# Altium PCB MotorBoardPCB.PcbDoc
Units mil, origin at the board's own origin, x right, y up, seen from the top; angles counter-clockwise.
Board outline 6000 x 4000 mil, 2 copper layers (Top Layer, Bottom Layer); 8 components, 5 nets, 17 pads, 2 vias.
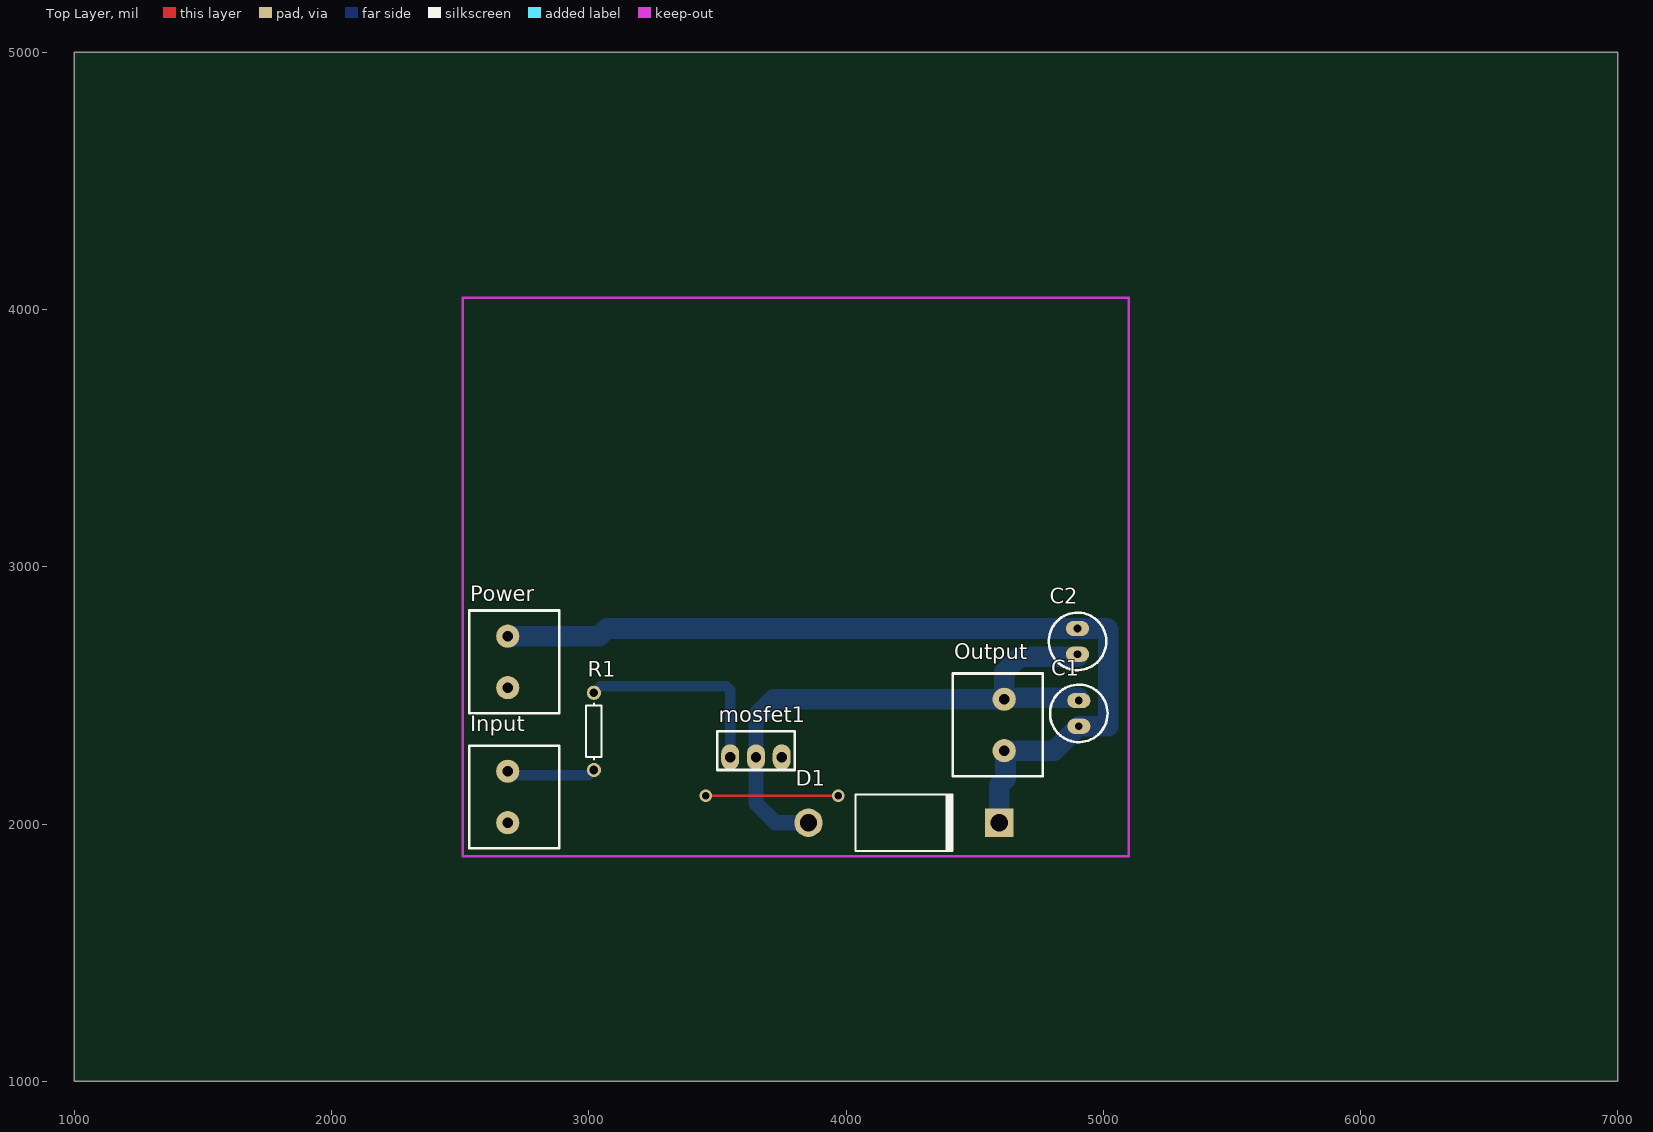
[diagram p0: Top Layer view]
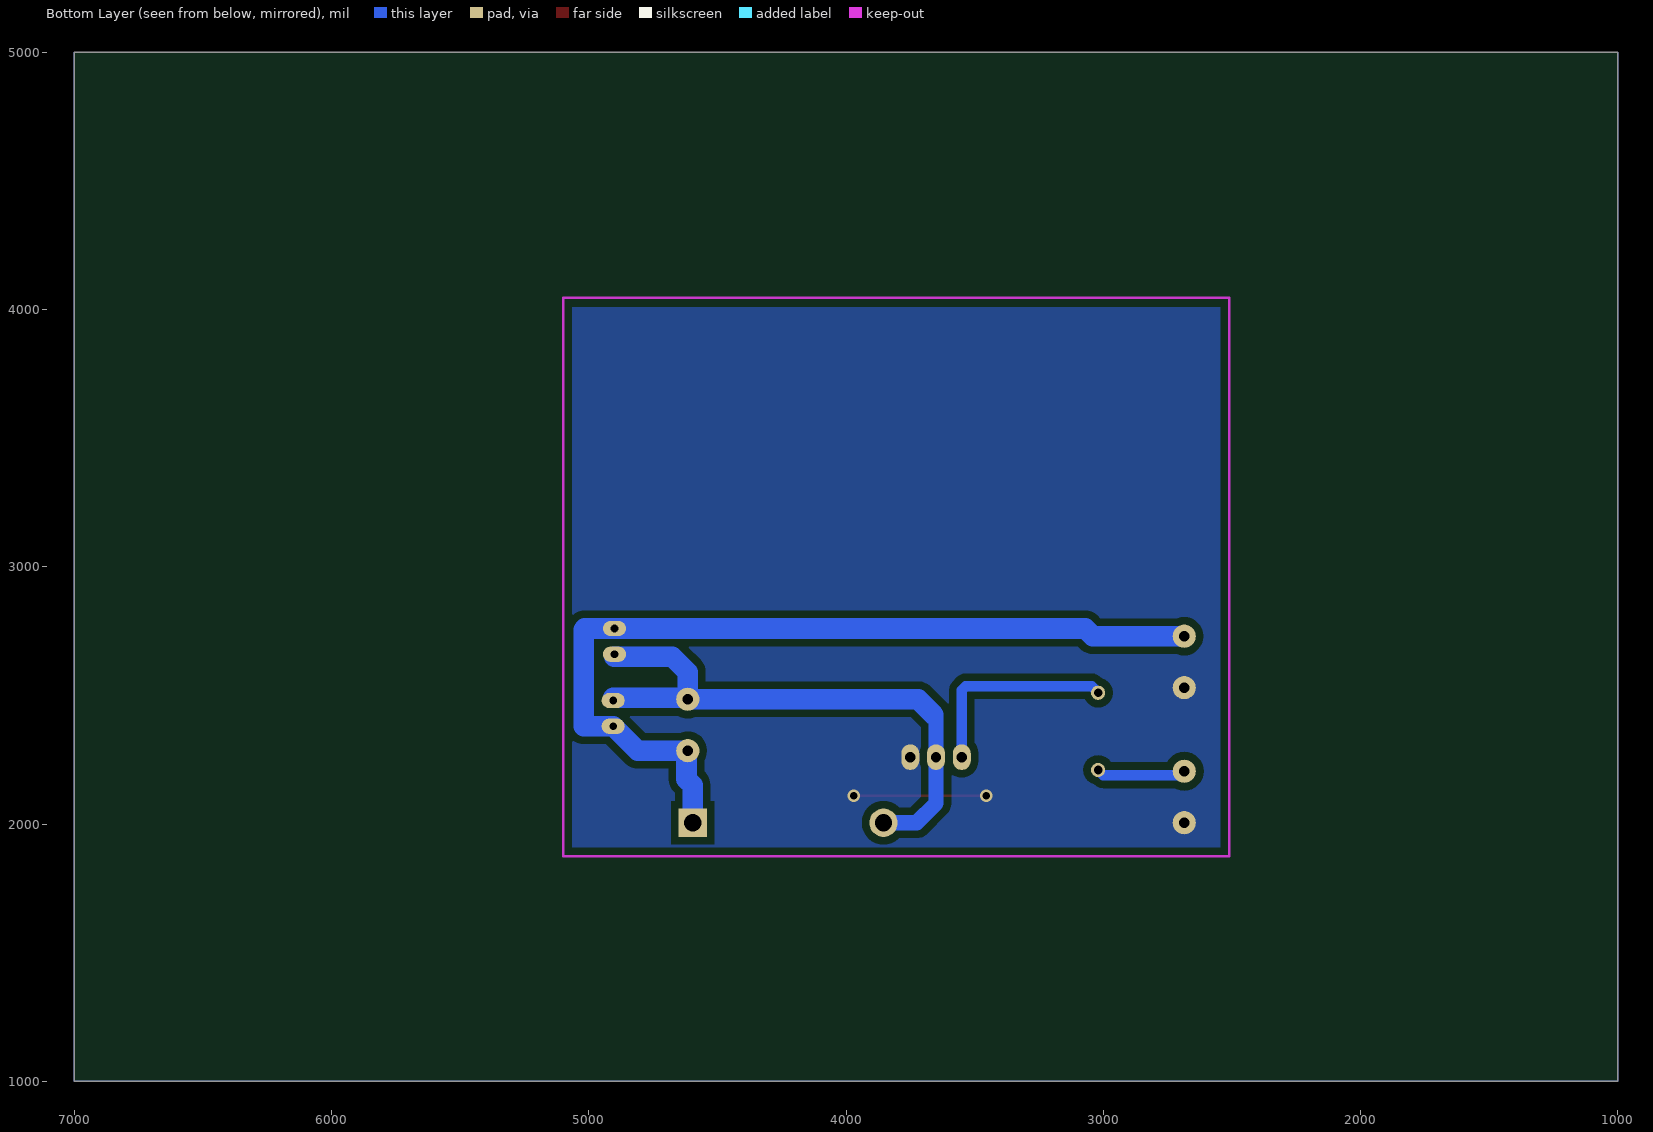
[diagram p1: Bottom Layer view, seen from below]

## Layer stack, top to bottom
Top Layer: signal copper 1.4
Dielectric: dielectric 12.6, FR-4, Dk 4.8
Bottom Layer: signal copper 1.4

## Board outline
1000,1000 7000,1000 7000,5000 1000,5000

## Design rules (kind name [scope] priority, off if disabled: settings)
Clearance [All] p1: gap=30
PolygonConnect [All] p1: connectstyle=Direct reliefconductorwidth=10 reliefentries=4 polygonreliefangle="90 Angle" airgapwidth=10
RoutingVias [All] p1: holewidth=28 width=50 viastyle="Through Hole" minholewidth=28 minwidth=50 maxholewidth=28 maxwidth=50
SolderMaskExpansion [All] p1: expansion=4
Width [All] p1: maxlimit=100 minlimit=10 preferedwidth=80 toplayer_maxwidth=10 toplayer_prefwidth=10 bottomlayer_minwidth=40 minimp=50.000000 maximp=50.000000 favimp=50.000000
28 further rules are at their usual default settings.

## Components (designator, comment, footprint, x,y, rotation, side; value= is the part's Value field where it differs from the comment)
C1 "Cap Pol1" Electrolytic_Capacitor 4905,2430 r90 top
C2 "Cap Pol1" Electrolytic_Capacitor 4900,2710 r270 top
D1 "Diode 1N5408" DO-201AD 4225,2005 r0 top
Input "Klema" Klema 2685,2105 r270 top
mosfet1 "irf540n" TO220 3650,2260 r0 top
Output "Klema" Klema 4615,2385 r90 top
Power "Klema" Klema 2685,2630 r270 top
R1 "Res1" AXIAL-0.3 3020,2360 r90 top

## Footprints (in the part's own frame and the unit in brackets; to place one, negate y for a bottom-side part, rotate by r counter-clockwise, add the part's x,y. Pads: shape width x height; smd on the part's side, far side on the other; paste and mask are expansions set on the pad)
AXIAL-0.3 [mm] "Axial Device, Thru-Hole; 2 Leads; 0.3 in Pin Spacing"
  round 1.4 hole 0.85: 1(-3.81,0) 2(3.81,0)
  silkscreen extent -2.77,-0.76 2.77,0.76
DO-201AD [mm] "Diode, Axial; Body 9.5 x 5.6 mm (LxDia. max), Lead Dia. 1.32 mm (max)"
  round 2.8 hole 1.7: 1(-9.42,0)
  rect 2.8x2.8 hole 1.7: 2(9.42,0)
  silkscreen extent -4.8,-2.8 4.9,2.8
Electrolytic_Capacitor [mil]
  oval 60x90 hole 30: 1(-50,0) 2(50,0)
  silkscreen extent -112,-112 112,112
Klema [mil]
  round 90 hole 40: 1(-100,0) 2(100,0)
  silkscreen extent -200,-150 200,200
TO220 [mil]
  oval 70x100 hole 40: 1(-100,0) 2(0,0) 3(100,0)
  silkscreen extent -150,-50 150,100

## Part data
C1 C2: "Polarized Capacitor (Radial)"
D1: "3 Amp Medium Power Silicon Rectifier Diode"
R1: "Resistor"

## Via types
v1: diameter 50, hole 28, Top Layer to Bottom Layer, 2 vias

## Nets (pads, with @x,y where several pads share a name; then routed paths per layer and width w, separated by ;. In a path a pad name is that pad's centre, name@x,y a point inside that pad or via, vN(x,y) a via of type N, cw(c..) or ccw(c..) an arc to the next point about the centre after c; other vN are vias at no path point)
12V: C1.1 C2.1 D1.2 Output.1 Power.1 | length 3475.9
  Bottom Layer w80: Power.1 3040,2730 3070,2760 C2.1 5015,2760 5020,2755 5020,2380 C1.1 4810,2285 Output.1 4620,2280 4620,2175 4595.87,2150.87 D1.2@4595.87,1990
GND: Input.2 mosfet1.3 Power.2 | length 515
  Top Layer w10: v1(3455,2110) v1(3970,2110)
INPUT: Input.1 R1.1 | length 349.5
  Bottom Layer w40: Input.1 2700,2190 3000,2190 R1.1
NetC1_2: C1.2 C2.2 D1.1 mosfet1.2 Output.2 | length 2271.1
  Bottom Layer w60: 3660,2425 3650,2415 mosfet1.2 3650,2080 3725,2005 D1.1
  Bottom Layer w80: 3660,2425 3720,2485 Output.2 ; C2.2@4900,2650 4675,2650 4615,2590 Output.2 ; C1.2@4905,2490 4620,2490 Output.2
Netmosfet1_1: mosfet1.1 R1.2 | length 806.6
  Bottom Layer w40: R1.2 3045,2535 3535,2535 3550,2520 mosfet1.1

## Polygon pours and split planes (outlines as drawn)
GND on Bottom Layer "Top Layer-No Net" (solid, remove dead copper, shelved, pour order 6): 1000,1000 7000,1000 7000,5000 1000,5000
GND on Bottom Layer "Top Layer-No Net1" (solid, remove dead copper, pour order 4): 1000,1000 7000,1000 7000,5000 1000,5000

## Keep-outs
Keep-Out Layer:
  lines w10: 2510,1875 5100,1875 5100,4045 2510,4045 2510,1875